# Altium PCB electronic_dc_load_v2.PcbDoc (part 2 of 4)
Units mm, origin at the board's own origin, x right, y up, seen from the top; angles counter-clockwise.
Board outline 170 x 170 mm, 4 copper layers (Top Layer, Int1(GND), Int2, Bottom Layer(PWR)), stack 1.607 mm thick; 177 components, 118 nets, 502 pads, 141 vias.
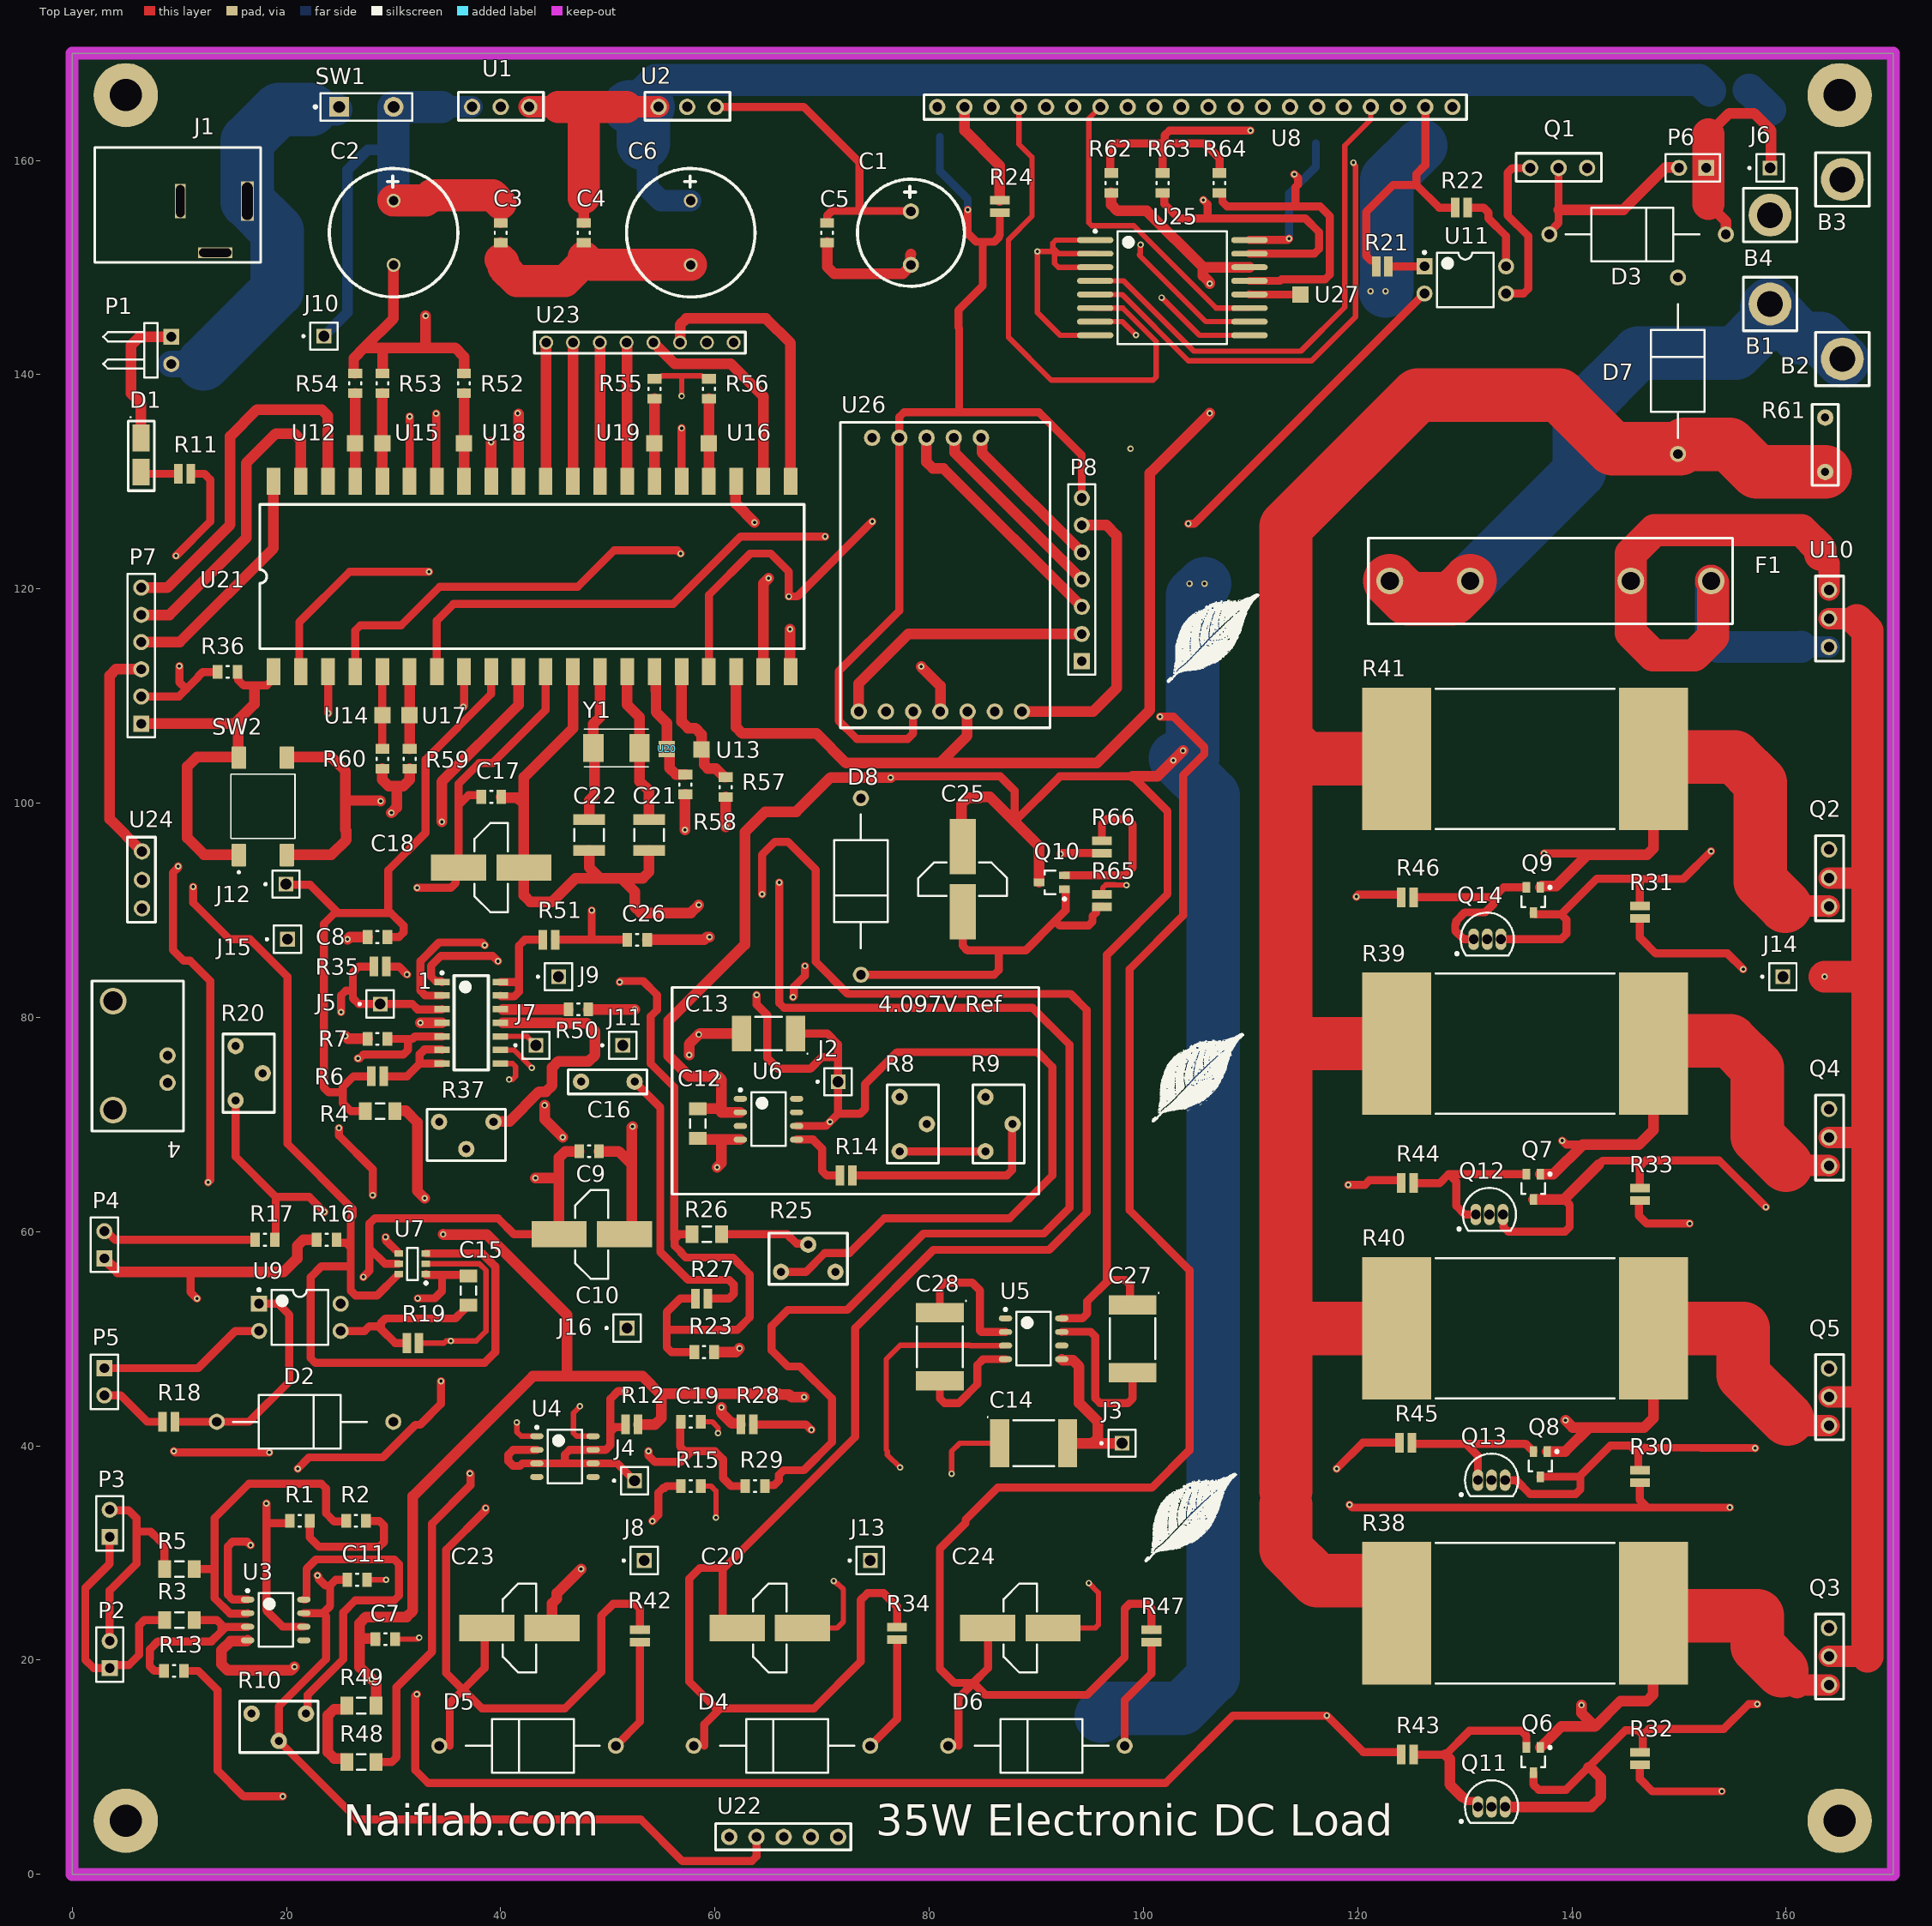
[diagram p0: Top Layer view]

## Part data (continued)
R1 R2 R13 R15 R36 R62 R63 R64: "RES SMD 10K OHM 1/4W 0604 WIDE", Case Code (Imperial)=0406, Case Code (Metric)=1016, Case/Package=Molded, Manufacturer=Vishay, Manufacturer Part Number=MCW0406MD1002BP100, Max Operating Temperature=155°C, Min Operating Temperature=-55°C, Power Rating=250mW, Resistor Type="Thin Film", Supplier Part Number 1=31W9016, Temperature Coefficient=25ppm/°C, Tolerance=0.1%, Voltage Rating=50V, Category="Chip SMD Resistors", ComponentLink1Description=http://www.farnell.com/datasheets/2046107.pdf?src-supplier=Farnell, ComponentLink1URL=http://www.farnell.com/datasheets/2046107.pdf?src-supplier=Farnell, ComponentLink2Description=http://www.mouser.com/ds/2/427/mcw406atpre-111221.pdf?src-supplier=Mouser, ComponentLink2URL=http://www.mouser.com/ds/2/427/mcw406atpre-111221.pdf?src-supplier=Mouser, ComponentLink3Description=http://components.arrow.com/part/dataview/53344020S9999208N6892?src-supplier=Arrow+Electronics, ComponentLink3URL=http://components.arrow.com/part/dataview/53344020S9999208N6892?src-supplier=Arrow+Electronics, ComponentLink4Description=http://www.farnell.com/datasheets/2046107.pdf?src-supplier=Element14, ComponentLink4URL=http://www.farnell.com/datasheets/2046107.pdf?src-supplier=Element14, ComponentLink5Description=http://www.vishay.com/docs/28847/mcw406atpre.pdf?src-supplier=Digi-Key, ComponentLink5URL=http://www.vishay.com/docs/28847/mcw406atpre.pdf?src-supplier=Digi-Key, ComponentLink6Description=http://www.vishay.com/docs/28847/mcw406atpre.pdf?src-supplier=Avnet, ComponentLink6URL=http://www.vishay.com/docs/28847/mcw406atpre.pdf?src-supplier=Avnet, Contact Plating=Tin, Depth=1.5mm, Height=0.3mm, Lead Free="Lead Free", Length=1.6mm, Military Standard=Not, Packaging="Tape and Reel", Pricing 1="1000=0.44000 (USD)", REACH SVHC=Unknown, Resistance=10kR, RoHS=Yes, Supplier 1=Newark, Voltage Rating (DC)=50V, Width=1mm
R3 R4 R5 R48 R49: "Res Thin Film 1206 1M Ohm 0.1% 0.25W(1/4W) ±25ppm/C Molded SMD Automotive Paper T/R", Case Code (Imperial)=1206, Case Code (Metric)=3216, Manufacturer="Vishay Dale", Manufacturer Part Number=TNPW12061M00BEEA, Max Operating Temperature=125°C, Max Power Dissipation=250mW, Min Operating Temperature=-55°C, Package Quantity=5000, Resistance=1MR, Resistance Tolerance=0.1%, Resistor Type="Thin Film", Supplier Part Number 1=TNP1.00MACCT-ND, Temperature Coefficient=25ppm/°C, Voltage Rating=200V, Case/Package=1206, Category="Chip SMD Resistors", ComponentLink1Description=https://datasheet.ciiva.com/2484/tnpw-e3-2484754.pdf?src-supplier=Digi-Key, ComponentLink1URL=https://datasheet.ciiva.com/2484/tnpw-e3-2484754.pdf?src-supplier=Digi-Key, ComponentLink2Description=https://datasheet.ciiva.com/2484/tnpw-e3-2484755.pdf?src-supplier=Digi-Key, ComponentLink2URL=https://datasheet.ciiva.com/2484/tnpw-e3-2484755.pdf?src-supplier=Digi-Key, ComponentLink3Description=https://datasheet.ciiva.com/2484/tnpw-e3-2484756.pdf?src-supplier=Digi-Key, ComponentLink3URL=https://datasheet.ciiva.com/2484/tnpw-e3-2484756.pdf?src-supplier=Digi-Key, ComponentLink4Description=https://datasheet.ciiva.com/22675/1599293-22675126.pdf?src-supplier=Element14, ComponentLink4URL=https://datasheet.ciiva.com/22675/1599293-22675126.pdf?src-supplier=Element14, ComponentLink5Description=https://datasheet.ciiva.com/16757/70201627-16757642.pdf?src-supplier=Allied+Electronics, ComponentLink5URL=https://datasheet.ciiva.com/16757/70201627-16757642.pdf?src-supplier=Allied+Electronics, ComponentLink6Description=https://datasheet.ciiva.com/46383/1599293-46383851.pdf?src-supplier=Element14, ComponentLink6URL=https://datasheet.ciiva.com/46383/1599293-46383851.pdf?src-supplier=Element14, Construction=Rectangular, Contact Plating=Tin, Depth=1.6mm, Features="Moisture Resistant,Automotive AEC-Q200,Anti-Sulfur", Height=0.55mm, Lead Free="Lead Free", Length=3.2mm, Military Standard=Not, Mount="Surface Mount", Number of Terminations=2, Packaging="Tape and Reel", Power Rating=250mW, Pricing 1="1=0.72000, 10=0.62700, 100=0.43700, 1000=0.25650, 2500=0.25270 (USD)", Radiation Hardening=No, REACH SVHC=Unknown, RoHS=Yes, RoHS Compliant=Yes, Series=TNPW, Size Code=1206, Stock 1=47810, Supplier 1=Digi-Key, Technology="THIN FILM", Termination=SMD/SMT, Tolerance=0.1%, Voltage Rating (DC)=200V, Width=1.6mm
R6 R18 R28 R51: "100Ω ±0.1%  0.25W"
R7 R16 R17 R23 R29 R50 R52 R53 R54 R55 R56 R57 R58 R59 R60: "RES SMD 10K OHM 0.1% 1/4W 0805", Case Code (Imperial)=0805, Case Code (Metric)=2012, Manufacturer=Panasonic, Manufacturer Part Number=ERJ-PB6B1002V, Max Operating Temperature=155°C, Max Power Dissipation=250mW, Min Operating Temperature=-55°C, Resistance=10kR, Resistor Type="Thick Film", Supplier Part Number 1=667-ERJ-PB6B1002V, Temperature Coefficient=50ppm/°C, Tolerance=0.1%, Case/Package=0805, Category="Chip SMD Resistors", ComponentLink1Description=https://industrial.panasonic.com/cdbs/www-data/pdf/RDM0000/DMM0000COL5.pdf?src-supplier=Digi-Key, ComponentLink1URL=https://industrial.panasonic.com/cdbs/www-data/pdf/RDM0000/DMM0000COL5.pdf?src-supplier=Digi-Key, ComponentLink2Description=https://industrial.panasonic.com/sa/system/files/data/download/catalog/id_fixed-resistors_e_2.pdf?src-supplier=Digi-Key, ComponentLink2URL=https://industrial.panasonic.com/sa/system/files/data/download/catalog/id_fixed-resistors_e_2.pdf?src-supplier=Digi-Key, Features="Automotive AEC-Q200", Height - Seated (Max)=0.028inch, Length=0.079inch, Number of Terminations=2, Packaging="Tape and Reel", Pricing 1="1=0.27000, 10=0.19900, 50=0.15600, 100=0.09100, 1000=0.04700, 10000=0.03500 (USD)", RoHS=Yes, Stock 1=10409, Supplier 1=Mouser, Width=0.049inch
R8 R9 R10 R25: "BOURNS         3296P-1-203LF            TRIMMER, 25 TURN 20K", Color=Blue, Manufacturer=Bourns, Manufacturer Part Number=3296P-1-203LF, Max Operating Temperature=125°C, Max Power Dissipation=500mW, Min Operating Temperature=-55°C, Package Quantity=50, Resistance=20kR, Resistance Tolerance=10%, Resistor Type=Cermet, Temperature Coefficient=100ppm/°C, Category="Variable Resistors and Potentiometers", ComponentLink1Description=https://datasheet.ciiva.com/1570/3296-1570384.pdf?src-supplier=Newark, ComponentLink1URL=https://datasheet.ciiva.com/1570/3296-1570384.pdf?src-supplier=Newark, ComponentLink2Description=https://datasheet.ciiva.com/11832/0900766b8069ccf4-11832206.pdf?src-supplier=RSComponents, ComponentLink2URL=https://datasheet.ciiva.com/11832/0900766b8069ccf4-11832206.pdf?src-supplier=RSComponents, ComponentLink3Description=https://datasheet.ciiva.com/29190/447270-da-01-en-trimmer-tht3296p-1-203lf-20-k-0-5w-29190277.pdf?src-supplier=Conrad, ComponentLink3URL=https://datasheet.ciiva.com/29190/447270-da-01-en-trimmer-tht3296p-1-203lf-20-k-0-5w-29190277.pdf?src-supplier=Conrad, ComponentLink4Description=https://datasheet.ciiva.com/2158/3296-2158304.pdf?src-supplier=Digi-Key, ComponentLink4URL=https://datasheet.ciiva.com/2158/3296-2158304.pdf?src-supplier=Digi-Key, ComponentLink5Description=https://datasheet.ciiva.com/8088/3296-8088855.pdf?src-supplier=Avnet, ComponentLink5URL=https://datasheet.ciiva.com/8088/3296-8088855.pdf?src-supplier=Avnet, ComponentLink6Description=https://datasheet.ciiva.com/14173/ew3296-dat-e-14173049.pdf?src-supplier=Distrelec, ComponentLink6URL=https://datasheet.ciiva.com/14173/ew3296-dat-e-14173049.pdf?src-supplier=Distrelec, ComponentLink7Description=https://datasheet.ciiva.com/16715/70153578-16715724.pdf?src-supplier=Allied+Electronics, ComponentLink7URL=https://datasheet.ciiva.com/16715/70153578-16715724.pdf?src-supplier=Allied+Electronics, ComponentLink8Description=https://datasheet.ciiva.com/1131/1815117-1131230.pdf?src-supplier=Element14, ComponentLink8URL=https://datasheet.ciiva.com/1131/1815117-1131230.pdf?src-supplier=Element14, Depth=11.55mm, Height=0.19inch, Lead Free="Lead Free", Length=9.53mm, Military Standard=Not, Mount="Through Hole,Panel,PCB", Number of Turns=25, Packaging=Rail/Tube, Power Rating=500mW, Pricing 1="100=1.67000, 500=1.31000 (USD)", Radiation Hardening=No, REACH SVHC="No SVHC", RoHS=Yes, RoHS Compliant=Yes, Series=3296, Stock 1=729, Supplier 1=Newark, Taper=Linear, Technology=CERMET, Termination=Pin, Tolerance=10%, Weight=0.03oz, Width=0.395inch
R11 R21 R24 R27 R34 R35 R42 R47: "Resistor;  Thin Film;  Res 1 Kilohms;  Pwr-Rtg 0.25 W;  Tol 0.1%;  SMT;  0805", Case Code (Imperial)=0805, Case Code (Metric)=2012, Manufacturer="TT IRC", Manufacturer Part Number=PFC-W0805LF-03-1001-B, Max Operating Temperature=150°C, Min Operating Temperature=-55°C, Package Quantity=1000, Power Rating=250mW, Resistance Tolerance=0.1%, Resistor Type="Thin Film", Supplier Part Number 1=66-PFC08LF1.0K-B, Temperature Coefficient=25ppm/°C, Voltage Rating=100V, Case/Package=0805, Category="Chip SMD Resistors", ComponentLink1Description=https://datasheet.ciiva.com/26849/getdatasheetpartid-728507-26849970.pdf?src-supplier=Verical, ComponentLink1URL=https://datasheet.ciiva.com/26849/getdatasheetpartid-728507-26849970.pdf?src-supplier=Verical, ComponentLink2Description=https://datasheet.ciiva.com/8036/126955-8036106.pdf?src-supplier=Element14, ComponentLink2URL=https://datasheet.ciiva.com/8036/126955-8036106.pdf?src-supplier=Element14, ComponentLink3Description=https://datasheet.ciiva.com/16756/70061376-16756399.pdf?src-supplier=Allied+Electronics, ComponentLink3URL=https://datasheet.ciiva.com/16756/70061376-16756399.pdf?src-supplier=Allied+Electronics, Construction=Rectangular, Depth=1.27mm, Height=0.5mm, Lead Free="Lead Free", Length=2.05mm, Military Standard=Not, Number of Pins=2, Packaging="Tape and Reel", Pricing 1="1=0.98000, 10=0.95500, 50=0.82700, 100=0.76400, 1000=0.50900, 10000=0.44600 (USD)", REACH SVHC="No SVHC", Resistance=1kR, RoHS=Yes, RoHS Compliant=Yes, Series=PFC, Size Code=0805, Stock 1=8948, Supplier 1=Mouser, Termination=SMD/SMT, Tolerance=0.1%, Voltage Rating (DC)=100V, Width=1.27mm
R12 R22 R30 R31 R32 R33: "2.2K ±0.1%  0.25W"
R14: "470K ohms ± 0.1% 0.25W"
R19: "47K ±0.1% 0.25W"
R20: "BOURNS         3296Y-1-504LF            TRIMMER, 25 TURN 500K", Color=Blue, Manufacturer=Bourns, Manufacturer Part Number=3296Y-1-504LF, Max Operating Temperature=125°C, Max Power Dissipation=500mW, Min Operating Temperature=-55°C, Package Quantity=50, Resistance=500kR, Resistance Tolerance=10%, Resistor Type=Cermet, Temperature Coefficient=100ppm/°C, Voltage Rating=300V, Category="Variable Resistors and Potentiometers", ComponentLink1Description=https://datasheet.ciiva.com/11832/0900766b8069ccf4-11832260.pdf?src-supplier=RSComponents, ComponentLink1URL=https://datasheet.ciiva.com/11832/0900766b8069ccf4-11832260.pdf?src-supplier=RSComponents, ComponentLink2Description=https://datasheet.ciiva.com/29122/447312-da-01-en-trimmer-tht-3296y-1-504lf-500k-0-5w-29122395.pdf?src-supplier=Conrad, ComponentLink2URL=https://datasheet.ciiva.com/29122/447312-da-01-en-trimmer-tht-3296y-1-504lf-500k-0-5w-29122395.pdf?src-supplier=Conrad, ComponentLink3Description=https://datasheet.ciiva.com/2156/3296-2156913.pdf?src-supplier=Digi-Key, ComponentLink3URL=https://datasheet.ciiva.com/2156/3296-2156913.pdf?src-supplier=Digi-Key, ComponentLink4Description=https://datasheet.ciiva.com/1131/1815117-1131508.pdf?src-supplier=Element14, ComponentLink4URL=https://datasheet.ciiva.com/1131/1815117-1131508.pdf?src-supplier=Element14, ComponentLink5Description=https://datasheet.ciiva.com/3266/3296-3266550.pdf?src-supplier=Avnet, ComponentLink5URL=https://datasheet.ciiva.com/3266/3296-3266550.pdf?src-supplier=Avnet, ComponentLink6Description=https://datasheet.ciiva.com/20164/68-0300e-20164135.pdf?src-supplier=Rapid+Electronics, ComponentLink6URL=https://datasheet.ciiva.com/20164/68-0300e-20164135.pdf?src-supplier=Rapid+Electronics, ComponentLink7Description=https://datasheet.ciiva.com/16716/70153578-16716249.pdf?src-supplier=Allied+Electronics, ComponentLink7URL=https://datasheet.ciiva.com/16716/70153578-16716249.pdf?src-supplier=Allied+Electronics, ComponentLink8Description=https://datasheet.ciiva.com/30113/3296-30113148.pdf?src-supplier=Onlinecomponents.com, ComponentLink8URL=https://datasheet.ciiva.com/30113/3296-30113148.pdf?src-supplier=Onlinecomponents.com, ComponentLink9Description=https://datasheet.ciiva.com/32423/dabourns3296-data-e-32423743.pdf?src-supplier=Distrelec, ComponentLink9URL=https://datasheet.ciiva.com/32423/dabourns3296-data-e-32423743.pdf?src-supplier=Distrelec, Depth=4.83mm, Height=0.395inch, Lead Diameter=0.5mm, Lead Free="Lead Free", Length=9.53mm, Military Standard=Not, Mount="Through Hole,Panel,PCB", Number of Turns=25, Packaging=Rail/Tube, Power Rating=500mW, Pricing 1="1=2.41000, 10=2.11700, 25=1.89800, 50=1.82500, 100=1.75200, 250=1.67900, 500=1.38700, 1000=1.31400, 5000=1.09500 (USD)", Radiation Hardening=No, REACH SVHC="No SVHC", RoHS=Yes, RoHS Compliant=Yes, Series=3296, Stock 1=290, Supplier 1=Digi-Key, Taper=Linear, Technology=CERMET, Termination=Pin, Tolerance=10%, Voltage Rating (DC)=300V, Weight=0.03oz, Width=0.19inch
R26: "Resistor SMD 4.7 MOhm  ±  1 % 1206, CRCW12064M70FKEA, Vishay", Case Code (Imperial)=1206, Case Code (Metric)=3216, Manufacturer=Vishay, Manufacturer Part Number=CRCW12064M70FKEA, Max Operating Temperature=155°C, Max Power Dissipation=250mW, Min Operating Temperature=-55°C, Package Quantity=10, Resistance=4.7MR, Resistance Tolerance=1%, Resistor Type="Thick Film", Supplier Part Number 1=541-4.70MFCT-ND, Temperature Coefficient=100ppm/°C, Voltage Rating=200V, Case/Package=1206, Category="Chip SMD Resistors", ComponentLink1Description=https://datasheet.ciiva.com/11811/0900766b80d98b5e-11811376.pdf?src-supplier=RSComponents, ComponentLink1URL=https://datasheet.ciiva.com/11811/0900766b80d98b5e-11811376.pdf?src-supplier=RSComponents, ComponentLink2Description=https://datasheet.ciiva.com/2497/dcrcwe3-2497009.pdf?src-supplier=Digi-Key, ComponentLink2URL=https://datasheet.ciiva.com/2497/dcrcwe3-2497009.pdf?src-supplier=Digi-Key, ComponentLink3Description=https://datasheet.ciiva.com/2497/dcrcwe3-2497010.pdf?src-supplier=Digi-Key, ComponentLink3URL=https://datasheet.ciiva.com/2497/dcrcwe3-2497010.pdf?src-supplier=Digi-Key, ComponentLink4Description=https://datasheet.ciiva.com/2497/dcrcwe3-2497011.pdf?src-supplier=Digi-Key, ComponentLink4URL=https://datasheet.ciiva.com/2497/dcrcwe3-2497011.pdf?src-supplier=Digi-Key, ComponentLink5Description=https://datasheet.ciiva.com/6074/1697337-6074135.pdf?src-supplier=Farnell, ComponentLink5URL=https://datasheet.ciiva.com/6074/1697337-6074135.pdf?src-supplier=Farnell, ComponentLink6Description=https://datasheet.ciiva.com/7843/1697337-7843431.pdf?src-supplier=Element14, ComponentLink6URL=https://datasheet.ciiva.com/7843/1697337-7843431.pdf?src-supplier=Element14, ComponentLink7Description=https://datasheet.ciiva.com/7843/1697337-7843432.pdf?src-supplier=Element14, ComponentLink7URL=https://datasheet.ciiva.com/7843/1697337-7843432.pdf?src-supplier=Element14, ComponentLink8Description=https://datasheet.ciiva.com/8896/dcrcwe3-8896296.pdf?src-supplier=Avnet, ComponentLink8URL=https://datasheet.ciiva.com/8896/dcrcwe3-8896296.pdf?src-supplier=Avnet, ComponentLink9Description=https://datasheet.ciiva.com/16894/dcrcwe3-16894747.pdf?src-supplier=Avnet+Europe, ComponentLink9URL=https://datasheet.ciiva.com/16894/dcrcwe3-16894747.pdf?src-supplier=Avnet+Europe, ComponentLink10Description=https://datasheet.ciiva.com/22706/1697337-22706301.pdf?src-supplier=Element14, ComponentLink10URL=https://datasheet.ciiva.com/22706/1697337-22706301.pdf?src-supplier=Element14, ComponentLink11Description=https://datasheet.ciiva.com/26316/fld-crcw-e3-data-en-26316494.pdf?src-supplier=Distrelec, ComponentLink11URL=https://datasheet.ciiva.com/26316/fld-crcw-e3-data-en-26316494.pdf?src-supplier=Distrelec, Construction=Rectangular, Contact Plating=Tin, Depth=1.6mm, Features="Automotive AEC-Q200", Height=0.55mm, Lead Free="Lead Free", Length=3.2mm, Military Standard=Not, Number of Pins=2, Number of Terminations=2, Packaging="Tape and Reel", Power Rating=250mW, Pricing 1="1=0.10000, 10=0.08000, 100=0.03060, 1000=0.01346, 2500=0.01162 (USD)", Radiation Hardening=No, REACH SVHC=Unknown, RoHS=Yes, RoHS Compliant=Yes, Series=CRCW, Stock 1=13706, Supplier 1=Digi-Key, Technology="THICK FILM", Termination=SMD/SMT, Tolerance=1%, Voltage Rating (DC)=200V, Weight=0.000353oz, Width=0.063inch
R37: "GLOVE, POLYAMIDE, L/FREE, PU, SIZE 6 - More Details", Color=Blue, Manufacturer=Bourns, Manufacturer Part Number=3296Y-1-201LF, Max Operating Temperature=125°C, Max Power Dissipation=500mW, Min Operating Temperature=-55°C, Package Quantity=50, Resistance Tolerance=10%, Resistor Type=Cermet, Supplier Part Number 1=3296Y-201LF-ND, Temperature Coefficient=100ppm/°C, Voltage Rating=300V, Category="Variable Resistors and Potentiometers", ComponentLink1Description=https://datasheet.ciiva.com/11831/0900766b8069ccf4-11831017.pdf?src-supplier=RSComponents, ComponentLink1URL=https://datasheet.ciiva.com/11831/0900766b8069ccf4-11831017.pdf?src-supplier=RSComponents, ComponentLink2Description=https://datasheet.ciiva.com/29122/447304-da-01-en-trimmer-tht3296y-1-201lf-200r-0-5w-29122391.pdf?src-supplier=Conrad, ComponentLink2URL=https://datasheet.ciiva.com/29122/447304-da-01-en-trimmer-tht3296y-1-201lf-200r-0-5w-29122391.pdf?src-supplier=Conrad, ComponentLink3Description=https://datasheet.ciiva.com/16716/70153578-16716822.pdf?src-supplier=Allied+Electronics, ComponentLink3URL=https://datasheet.ciiva.com/16716/70153578-16716822.pdf?src-supplier=Allied+Electronics, ComponentLink4Description=https://datasheet.ciiva.com/30066/3296-30066951.pdf?src-supplier=Onlinecomponents.com, ComponentLink4URL=https://datasheet.ciiva.com/30066/3296-30066951.pdf?src-supplier=Onlinecomponents.com, ComponentLink5Description=https://datasheet.ciiva.com/2158/3296-2158313.pdf?src-supplier=Digi-Key, ComponentLink5URL=https://datasheet.ciiva.com/2158/3296-2158313.pdf?src-supplier=Digi-Key, ComponentLink6Description=https://datasheet.ciiva.com/1131/1815117-1131451.pdf?src-supplier=Element14, ComponentLink6URL=https://datasheet.ciiva.com/1131/1815117-1131451.pdf?src-supplier=Element14, ComponentLink7Description=https://datasheet.ciiva.com/14173/dabourns3296-data-e-14173005.pdf?src-supplier=Distrelec, ComponentLink7URL=https://datasheet.ciiva.com/14173/dabourns3296-data-e-14173005.pdf?src-supplier=Distrelec, Depth=4.83mm, Height=0.395inch, Lead Diameter=0.5mm, Lead Free="Lead Free", Length=9.53mm, Military Standard=Not, Mount="Through Hole,Panel,PCB", Number of Turns=25, Packaging=Rail/Tube, Power Rating=500mW, Pricing 1="1=2.41000, 10=2.11700, 25=1.89800, 50=1.82500, 100=1.75200, 250=1.67900, 500=1.38700, 1000=1.31400, 5000=1.09500 (USD)", Radiation Hardening=No, REACH SVHC="No SVHC", Resistance=200R, RoHS=Yes, RoHS Compliant=Yes, Series=3296, Stock 1=3, Supplier 1=Digi-Key, Taper=Linear, Technology=CERMET, Termination=Pin, Tolerance=10%, Voltage Rating (DC)=300V, Weight=0.03oz, Width=9.53mm
R38 R39 R40 R41: "RES 1 OHM 5W 1% AXIAL", Case/Package=Conformal, Manufacturer="Vishay BCcomponents", Manufacturer Part Number=PAC500001008FAC000, Max Operating Temperature=275°C, Max Power Dissipation=5W, Min Operating Temperature=-55°C, Package Quantity=1, Resistor Type=Wirewound, Supplier Part Number 1=71-PAC500001008FAC00, Temperature Coefficient=100ppm/°C, Tolerance=1%, Category="Through-Hole Resistors", ComponentLink1Description=https://datasheet.ciiva.com/2720/pacserie-2720053.pdf?src-supplier=Digi-Key, ComponentLink1URL=https://datasheet.ciiva.com/2720/pacserie-2720053.pdf?src-supplier=Digi-Key, ComponentLink2Description=https://datasheet.ciiva.com/2720/pacserie-2720054.pdf?src-supplier=Digi-Key, ComponentLink2URL=https://datasheet.ciiva.com/2720/pacserie-2720054.pdf?src-supplier=Digi-Key, ComponentLink3Description=https://datasheet.ciiva.com/8401/pacserie-8401197.pdf?src-supplier=Avnet, ComponentLink3URL=https://datasheet.ciiva.com/8401/pacserie-8401197.pdf?src-supplier=Avnet, Construction=Cylindrical, Contact Plating=Tin, Diameter=7.5mm, Features="Flame Retardant Coating", Length=26mm, Military Standard=Not, Mount="Through Hole", Number of Terminations=2, Packaging="Tape and Reel", Power Rating=5W, Pricing 1="1=1.28000, 10=0.95500, 50=0.95500, 100=0.69800, 1000=0.48800, 10000=0.45600 (USD)", Radiation Hardening=No, Resistance=1R, RoHS=Yes, RoHS Compliant=Yes, Series=PAC, Stock 1=101, Supplier 1=Mouser, Termination=Axial
R43 R44 R45 R46: "270KR ±0.1%  0.25W"
R61: "BOURNS - PWR220T-35-R100F - RESISTOR, POWER, 0.1R, 0.01, 35W", Case/Package=TO-220, Manufacturer=Bourns, Manufacturer Part Number=PWR220T-35-R100F, Max Operating Temperature=155°C, Max Power Dissipation=35W, Min Operating Temperature=-55°C, Package Quantity=50, Resistance=100mR, Resistance Tolerance=1%, Resistor Type="Thick Film", Supplier Part Number 1=PWR220T-35-R100F-ND, Temperature Coefficient=100ppm/°C, Threshold Voltage=1.4V, Voltage Rating=2kV, Voltage Rating (DC)=250V, Category="Through-Hole Resistors", ComponentLink1Description=https://datasheet.ciiva.com/7986/1869472-7986042.pdf?src-supplier=Element14, ComponentLink1URL=https://datasheet.ciiva.com/7986/1869472-7986042.pdf?src-supplier=Element14, Construction=Rectangular, Depth=4mm, Features="Automotive AEC-Q200", Height=14.6mm, Lead Diameter=0.72mm, Lead Pitch=5.08mm, Length=10.1mm, Military Standard=Not, Number of Terminations=2, Packaging=Rail/Tube, Power Rating=35W, Pricing 1="1=4.48000, 10=4.05400, 100=3.01880, 1000=2.17350, 2500=2.13900 (USD)", REACH SVHC="No SVHC", RoHS=Yes, RoHS Compliant=Yes, Series=PWR220T-35, Stock 1=660, Supplier 1=Digi-Key, Technology="THICK FILM", Termination=Radial, Tolerance=1%, Width=0.157inch
R65: "330K ohms ±0.1%  0.25W"
R66: "100K ±0.1%  0.25W"
SW1: "Single-Pole, Single-Throw Switch", LatestRevisionDate=17-Jul-2002, LatestRevisionNote="Re-released for DXP Platform.", PackageDescription="Switch; 2 Leads", PackageReference=SPST-2, Published=24-Mar-1999, Publisher="Altium Limited"
SW2: "Switch Tactile OFF (ON) SPST Round Button Gull Wing 0.05A 24VDC 2.6N SMD T/R", Package=None, Availability=Unavailable, MF="{'manufacturer': u'TE Connectivity'}", MP=FSM4JSMA, Price=None
U1: "Fairchild Semiconductor", Case/Package=TO-220-3, Dropout Voltage=2V, Manufacturer="ON Semiconductor / Fairchild", Max Input Voltage=35V, Max Operating Temperature=125°C, Max Output Current=1A, Min Input Voltage=14.5V, Min Operating Temperature=-40°C, Min Output Voltage=12V, Output Voltage Accuracy=4%, Package Quantity=50, Power Supply Rejection Ratio (PSRR)=71dB, Quiescent Current=8mA, Accuracy=4%, Category="Voltage Regulators - Linear", ComponentLink1Description=https://datasheet.ciiva.com/26908/lm7812ct-26908840.pdf?src-supplier=IIIC, ComponentLink1URL=https://datasheet.ciiva.com/26908/lm7812ct-26908840.pdf?src-supplier=IIIC, ComponentLink2Description=https://datasheet.ciiva.com/2039/lm7805-2039371.pdf?src-supplier=Digi-Key, ComponentLink2URL=https://datasheet.ciiva.com/2039/lm7805-2039371.pdf?src-supplier=Digi-Key, ComponentLink3Description=https://datasheet.ciiva.com/25974/lm7812-25974492.pdf?src-supplier=Avnet+Europe, ComponentLink3URL=https://datasheet.ciiva.com/25974/lm7812-25974492.pdf?src-supplier=Avnet+Europe, Contact Plating=Tin,Matte, Height=8.89mm, Lead Free="Lead Free", Length=10.16mm, Manufacturer Part Number=LM7812CT, Mount="Through Hole", Nominal Output Voltage=12V, Number of Outputs=1, Number of Pins=3, Number of Regulators=1, Output Current=1A, Output Type=Fixed, Output Voltage=12V, Packaging=Rail/Tube, Polarity=Positive, Radiation Hardening=No, REACH SVHC="No SVHC", RoHS=Yes, RoHS Compliant=Yes, Stock 1=6000, Supplier 1=Avnet, Supplier Part Number 1=LM7812CT, Weight=1.214g, Width=4.7mm
U2: "Standard Regulator Pos 5V 2.2A 3-Pin(3+Tab) TO-220AB Rail", Case/Package=TO-220-3, Current Rating=1A, Dropout Voltage=2V, Manufacturer="ON Semiconductor / Fairchild", Max Input Voltage=35V, Max Operating Temperature=125°C, Max Output Voltage=5.2V, Min Input Voltage=7V, Min Operating Temperature=-40°C, Min Output Voltage=5V, Output Voltage Accuracy=4%, Package Quantity=50, Power Supply Rejection Ratio (PSRR)=73dB, Quiescent Current=8mA, Accuracy=4%, Category="Voltage Regulators - Linear", ComponentLink1Description=https://datasheet.ciiva.com/19456/786138-19456361.pdf?src-supplier=Jameco, ComponentLink1URL=https://datasheet.ciiva.com/19456/786138-19456361.pdf?src-supplier=Jameco, ComponentLink2Description=https://datasheet.ciiva.com/26904/lm7805ct-26904988.pdf?src-supplier=IIIC, ComponentLink2URL=https://datasheet.ciiva.com/26904/lm7805ct-26904988.pdf?src-supplier=IIIC, ComponentLink3Description=https://datasheet.ciiva.com/2039/lm7805-2039365.pdf?src-supplier=Digi-Key, ComponentLink3URL=https://datasheet.ciiva.com/2039/lm7805-2039365.pdf?src-supplier=Digi-Key, ComponentLink4Description=https://datasheet.ciiva.com/8239/lm7812-8239478.pdf?src-supplier=Avnet, ComponentLink4URL=https://datasheet.ciiva.com/8239/lm7812-8239478.pdf?src-supplier=Avnet, ComponentLink5Description=https://datasheet.ciiva.com/1512/1855686-1512106.pdf?src-supplier=Element14, ComponentLink5URL=https://datasheet.ciiva.com/1512/1855686-1512106.pdf?src-supplier=Element14, ComponentLink6Description=https://datasheet.ciiva.com/17332/lm7805-17332792.pdf?src-supplier=Future+Electronics, ComponentLink6URL=https://datasheet.ciiva.com/17332/lm7805-17332792.pdf?src-supplier=Future+Electronics, ComponentLink7Description=https://datasheet.ciiva.com/1512/1855686-1512105.pdf?src-supplier=Element14, ComponentLink7URL=https://datasheet.ciiva.com/1512/1855686-1512105.pdf?src-supplier=Element14, ComponentLink8Description=https://datasheet.ciiva.com/1511/1855686-1511835.pdf?src-supplier=Element14, ComponentLink8URL=https://datasheet.ciiva.com/1511/1855686-1511835.pdf?src-supplier=Element14, ComponentLink9Description=https://datasheet.ciiva.com/48694/001253095-da-01-en-ic-reg-ldo-5v-1a-lm7805ct-to-220-3-fsc-48694790.pdf?src-supplier=Conrad, ComponentLink9URL=https://datasheet.ciiva.com/48694/001253095-da-01-en-ic-reg-ldo-5v-1a-lm7805ct-to-220-3-fsc-48694790.pdf?src-supplier=Conrad, Height=16.3mm, Lead Free="Lead Free", Length=10.67mm, Manufacturer Part Number=LM7805CT, Max Output Current=1A, Mount="Through Hole", Nominal Output Voltage=5V, Number of Outputs=1, Number of Pins=3, Number of Regulators=1, Output Current=1A, Output Type=Fixed, Output Voltage=5V, Packaging=Rail/Tube, Polarity=Positive, Pricing 1="331=1.02898, 340=1.02141, 670=1.01384, 1700=1.00628, 3400=0.99871, 17000=0.99115, 34000=0.98358 (USD)", Radiation Hardening=No, REACH SVHC="No SVHC", RoHS=Yes, RoHS Compliant=Yes, Stock 1=9559, Supplier 1=Avnet, Supplier Part Number 1=LM7805CT, Weight=1.214g, Width=4.7mm
U3: "Operational Amplifier Single 1 MHz SO-8, OPA277UA, Texas Instruments", Case/Package=D, Dual Supply Voltage=9V, Input Bias Current=2.8nA, Input Offset Voltage (Vos)=20uV, Manufacturer="Texas Instruments", Manufacturer Part Number=OPA277UA, Max Dual Supply Voltage=18V, Max I/O Voltage=50uV, Max Operating Temperature=85°C, Min Dual Supply Voltage=2V, Min Operating Temperature=-40°C, Nominal Supply Current=825uA, Operating Supply Current=790uA, Output Current per Channel=35mA, Package Quantity=75, Supplier Part Number 1=OPA277UA-ND, Voltage Gain=140dB, Bandwidth=1MHz, Category="Amplifiers - Op Amps, Buffer, Instrumentation", Common Mode Rejection Ratio=115dB, ComponentLink1Description=https://datasheet.ciiva.com/2973/opa4277-2973984.pdf?src-supplier=Avnet, ComponentLink1URL=https://datasheet.ciiva.com/2973/opa4277-2973984.pdf?src-supplier=Avnet, ComponentLink2Description=https://datasheet.ciiva.com/1799/opa277-1799267.pdf?src-supplier=Digi-Key, ComponentLink2URL=https://datasheet.ciiva.com/1799/opa277-1799267.pdf?src-supplier=Digi-Key, ComponentLink3Description=https://datasheet.ciiva.com/7738/1830880-7738390.pdf?src-supplier=Element14, ComponentLink3URL=https://datasheet.ciiva.com/7738/1830880-7738390.pdf?src-supplier=Element14, ComponentLink4Description=https://datasheet.ciiva.com/26243/opa4277-26243593.pdf?src-supplier=Avnet+Europe, ComponentLink4URL=https://datasheet.ciiva.com/26243/opa4277-26243593.pdf?src-supplier=Avnet+Europe, Contact Plating=Gold, Gain Bandwidth Product=1MHz, Height=1.58mm, Lead Free="Lead Free", Length=4.9mm, Max Supply Voltage=18V, Nominal Gain Bandwidth Product=1MHz, Number of Amplifiers=1, Number of Channels=1, Number of Circuits=1, Number of Elements=1, Number of Pins=8, Packaging=Rail/Tube, Pricing 1="1=3.72000, 10=3.34300, 25=3.16000, 100=2.73880, 250=2.59832, 500=2.33148, 1000=2.21275 (USD)", Radiation Hardening=No, REACH SVHC="No SVHC", RoHS=Yes, RoHS Compliant=Yes, Slew Rate=0.8V/µs, Stock 1=3292, Supplier 1=Digi-Key, Unity Gain Bandwidth Product=1MHz, Width=3.91mm
U4: "V-Ref Adjustable 2.5V to 36V 100mA 8-Pin SOP T/R", Case/Package=SOP, Cathode Current=1mA, Current Rating=100mA, Manufacturer="ON Semiconductor / Fairchild", Max Input Voltage=36V, Max Operating Temperature=85°C, Min Operating Temperature=-25°C, Min Output Voltage=2.5V, Package Quantity=3000, Temperature Coefficient=50ppm/°C, Tolerance=2%, Category="Voltage References", ComponentLink1Description=https://datasheet.ciiva.com/4908/lm431a-189989-4908452.pdf?src-supplier=Mouser, ComponentLink1URL=https://datasheet.ciiva.com/4908/lm431a-189989-4908452.pdf?src-supplier=Mouser, ComponentLink2Description=https://datasheet.ciiva.com/29571/lm431a-29571926.pdf?src-supplier=Digi-Key, ComponentLink2URL=https://datasheet.ciiva.com/29571/lm431a-29571926.pdf?src-supplier=Digi-Key, ComponentLink3Description=https://datasheet.ciiva.com/29571/lm431a-29571925.pdf?src-supplier=Digi-Key, ComponentLink3URL=https://datasheet.ciiva.com/29571/lm431a-29571925.pdf?src-supplier=Digi-Key, ComponentLink4Description=https://datasheet.ciiva.com/9215/lm431c-9215048.pdf?src-supplier=Avnet, ComponentLink4URL=https://datasheet.ciiva.com/9215/lm431c-9215048.pdf?src-supplier=Avnet, Lead Free="Lead Free", Manufacturer Part Number=LM431ACMX, Max Output Current=100mA, Max Output Voltage=36V, Mount="Surface Mount", Number of Channels=1, Number of Pins=8, Output Current=100mA, Output Type=Adjustable, Output Voltage=36V, Packaging="Tape and Reel", Reference Type=Shunt,Adjustable, RoHS=Yes, RoHS Compliant=Yes, Series=-, Stock 1=40099, Supplier 1=Avnet, Supplier Part Number 1=LM431ACMX, Weight=0.2304g
U5: "LINEAR TECHNOLOGY - LTC1046CS8#PBF - VOLT CONVERTER, SMD, SOIC8, 1046", Case/Package=SOIC, Manufacturer="Analog Devices / Linear Technology", Manufacturer Part Number=LTC1046CS8#PBF, Max Input Voltage=6V, Max Operating Temperature=70°C, Max Output Current=50mA, Max Output Voltage=-1.5V, Min Input Voltage=1.5V, Min Operating Temperature=0°C, Min Output Voltage=-6V, Operating Supply Current=165uA, Output Voltage=3V, Package Quantity=100, Supplier Part Number 1=LTC1046CS8#PBF-ND, Switching Frequency=30kHz, Category="Voltage Regulators - Switching", ComponentLink1Description=https://datasheet.ciiva.com/2024/2898-2024864.pdf?src-supplier=Digi-Key, ComponentLink1URL=https://datasheet.ciiva.com/2024/2898-2024864.pdf?src-supplier=Digi-Key, ComponentLink2Description=https://datasheet.ciiva.com/30477/0900766b8125257c-30477616.pdf?src-supplier=RSComponents, ComponentLink2URL=https://datasheet.ciiva.com/30477/0900766b8125257c-30477616.pdf?src-supplier=RSComponents, ComponentLink3Description=https://datasheet.ciiva.com/15114/getdatasheetpartid-135603-15114038.pdf?src-supplier=Verical, ComponentLink3URL=https://datasheet.ciiva.com/15114/getdatasheetpartid-135603-15114038.pdf?src-supplier=Verical, ComponentLink4Description=https://datasheet.ciiva.com/19474/1745629-19474318.pdf?src-supplier=Jameco, ComponentLink4URL=https://datasheet.ciiva.com/19474/1745629-19474318.pdf?src-supplier=Jameco, ComponentLink5Description=https://datasheet.ciiva.com/26898/ltc1046cs8-pbf-26898654.pdf?src-supplier=IIIC, ComponentLink5URL=https://datasheet.ciiva.com/26898/ltc1046cs8-pbf-26898654.pdf?src-supplier=IIIC, ComponentLink6Description=https://datasheet.ciiva.com/6185/1573420-6185372.pdf?src-supplier=Farnell, ComponentLink6URL=https://datasheet.ciiva.com/6185/1573420-6185372.pdf?src-supplier=Farnell, Height=1.498mm, Lead Free="Lead Free", Length=5mm, Max Supply Voltage=6V, Min Supply Voltage=1.5V, Number of Outputs=1, Number of Pins=8, Output Current=50mA, Output Type=Adjustable, Packaging="Cut Tape", Pricing 1="1=6.96000, 10=6.29000, 25=5.99760, 100=5.20760, 250=4.97352, 500=4.53468, 1000=4.14000 (USD)", Radiation Hardening=No, REACH SVHC="No SVHC", RoHS=Yes, RoHS Compliant=Yes, Series=-, Stock 1=46, Supplier 1=Digi-Key, Synchronous Rectifier=No, Width=3.988mm
U6: "IC VREF SERIES 4.096V 8SOIC", Case/Package=D, Manufacturer="Texas Instruments", Max Input Voltage=18V, Max Operating Temperature=125°C, Max Output Current=10mA, Max Output Voltage=4.096V, Min Input Voltage=4.296V, Min Operating Temperature=-40°C, Operating Supply Current=800uA, Operating Supply Voltage=24V, Package Quantity=75, Quiescent Current=1mA, Supplier Part Number 1=595-REF5040AID, Temperature Coefficient=3ppm/°C, Tolerance=0.1%, Category="Voltage References", ComponentLink1Description=https://datasheet.ciiva.com/2007/ref5020-2007515.pdf?src-supplier=Digi-Key, ComponentLink1URL=https://datasheet.ciiva.com/2007/ref5020-2007515.pdf?src-supplier=Digi-Key, ComponentLink2Description=https://datasheet.ciiva.com/3235/ref5050-3235581.pdf?src-supplier=Avnet, ComponentLink2URL=https://datasheet.ciiva.com/3235/ref5050-3235581.pdf?src-supplier=Avnet, Height=1.5mm, Lead Free="Lead Free", Length=5mm, Manufacturer Part Number=REF5040AID, Number of Channels=1, Number of Pins=8, Output Current=10mA, Output Voltage=4.096V, Packaging=Rail/Tube, Pricing 1="1=4.08000, 10=3.67000, 50=3.47000, 100=3.47000, 1000=3.47000, 10000=3.47000 (USD)", Radiation Hardening=No, REACH SVHC="No SVHC", Reference Type=Series,Fixed, Reference Voltage=4.096V, RoHS=Yes, RoHS Compliant=Yes, Stock 1=277, Supplier 1=Mouser, Weight=0.002677oz, Width=4mm
U7: "INVERTER SCHMITT TRIGGER, SOT-23-6, FULL REEL; Logic Type:Inverter Schmitt Trigger; Output Current:32mA; No. of Inputs:1; Supply Voltage Min:1.65V; Supply Voltage Max:5.5V; Logic Case Style:SOT-23; No. of Pins:6; Family Type:LVC ;RoHS Compliant: Yes", Case/Package=SOT-23, High Level Output Current=-32mA, Low Level Output Current=32mA, Manufacturer="Texas Instruments", Max Operating Temperature=125°C, Max Supply Voltage=5.5V, Min Operating Temperature=-40°C, Min Supply Voltage=1.65V, Package Quantity=3000, Quiescent Current=10uA, Supplier Part Number 1=296-13010-1-ND, Category="Logic Gates", ComponentLink1Description=https://datasheet.ciiva.com/4827/sn74lvc2g14-50958-4827361.pdf?src-supplier=Mouser, ComponentLink1URL=https://datasheet.ciiva.com/4827/sn74lvc2g14-50958-4827361.pdf?src-supplier=Mouser, ComponentLink2Description=https://datasheet.ciiva.com/28540/1772571-28540805.pdf?src-supplier=Element14, ComponentLink2URL=https://datasheet.ciiva.com/28540/1772571-28540805.pdf?src-supplier=Element14, ComponentLink3Description=https://datasheet.ciiva.com/15089/getdatasheetpartid-44147-15089068.pdf?src-supplier=Verical, ComponentLink3URL=https://datasheet.ciiva.com/15089/getdatasheetpartid-44147-15089068.pdf?src-supplier=Verical, ComponentLink4Description=https://datasheet.ciiva.com/34301/1046238-34301917.pdf?src-supplier=Jameco, ComponentLink4URL=https://datasheet.ciiva.com/34301/1046238-34301917.pdf?src-supplier=Jameco, ComponentLink5Description=https://datasheet.ciiva.com/1864/sn74lvc2g14-1864305.pdf?src-supplier=Digi-Key, ComponentLink5URL=https://datasheet.ciiva.com/1864/sn74lvc2g14-1864305.pdf?src-supplier=Digi-Key, ComponentLink6Description=https://datasheet.ciiva.com/1864/sn74lvc2g14-1864306.pdf?src-supplier=Digi-Key, ComponentLink6URL=https://datasheet.ciiva.com/1864/sn74lvc2g14-1864306.pdf?src-supplier=Digi-Key, ComponentLink7Description=https://datasheet.ciiva.com/1864/sn74lvc2g14-1864307.pdf?src-supplier=Digi-Key, ComponentLink7URL=https://datasheet.ciiva.com/1864/sn74lvc2g14-1864307.pdf?src-supplier=Digi-Key, ComponentLink8Description=https://datasheet.ciiva.com/14288/sn74lvc2g14-14288309.pdf?src-supplier=Avnet, ComponentLink8URL=https://datasheet.ciiva.com/14288/sn74lvc2g14-14288309.pdf?src-supplier=Avnet, ComponentLink9Description=https://datasheet.ciiva.com/26042/sn74lvc2g14-26042406.pdf?src-supplier=Avnet+Europe, ComponentLink9URL=https://datasheet.ciiva.com/26042/sn74lvc2g14-26042406.pdf?src-supplier=Avnet+Europe, ComponentLink10Description=https://datasheet.ciiva.com/7783/1768119-7783611.pdf?src-supplier=Element14, ComponentLink10URL=https://datasheet.ciiva.com/7783/1768119-7783611.pdf?src-supplier=Element14, ComponentLink11Description=https://datasheet.ciiva.com/7783/1768119-7783612.pdf?src-supplier=Element14, ComponentLink11URL=https://datasheet.ciiva.com/7783/1768119-7783612.pdf?src-supplier=Element14, Contact Plating=Tin,Matte, Height=1.15mm, Lead Free="Lead Free", Length=2.9mm, Logic Function="Buffer,Inverter,Inverting,Schmitt Trigger", Manufacturer Part Number=SN74LVC2G14DBVR, Max Output Current=32mA, Mount="Surface Mount", Number of Bits=2, Number of Circuits=2, Number of Elements=2, Number of Gates=2, Number of Inputs=1, Number of Pins=6, Output Current=32mA, Packaging="Tape and Reel", Pricing 1="1=0.43000, 10=0.32300, 25=0.29160, 100=0.20140, 250=0.16960, 500=0.13780, 1000=0.10600 (USD)", Propagation Delay=9.5ns, Radiation Hardening=No, REACH SVHC="No SVHC", RoHS=Yes, RoHS Compliant=Yes, Schmitt Trigger Input=Yes, Stock 1=686, Supplier 1=Digi-Key, Termination=SMD/SMT, Turn-On Delay Time=4.3ns, Weight=0.000557oz, Width=1.6mm
U8: "Grapghic LCD based  on st7920  controller  128x64"
U9 U11: "4-Pin Phototransistor Optocoupler", DatasheetVersion=Nov-2003, LatestRevisionDate=04-Mar-2005, LatestRevisionNote="Sch pins 3 & 4 Swapped.", PackageReference=DIP-4, Published=24-Mar-1999, Publisher="Altium Limited"
U10: "DIODE ARRAY SCHOTTKY 100V TO220", Average Rectified Current=20A, Case/Package=TO-220-3, Forward Voltage=900mV, Manufacturer="ON Semiconductor", Max Forward Surge Current (Ifsm)=350A, Max Operating Temperature=175°C, Max Repetitive Reverse Voltage (Vrrm)=100V, Max Reverse Current=10uA, Min Operating Temperature=-65°C, Package Quantity=50, Supplier Part Number 1=MBR41H100CTGOS-ND, Category="Schottky Diodes", ComponentLink1Description=https://datasheet.ciiva.com/908/mbr41h100ct-d-908465.pdf?src-supplier=Avnet, ComponentLink1URL=https://datasheet.ciiva.com/908/mbr41h100ct-d-908465.pdf?src-supplier=Avnet, ComponentLink2Description=https://datasheet.ciiva.com/30479/0900766b812212ba-30479299.pdf?src-supplier=RSComponents, ComponentLink2URL=https://datasheet.ciiva.com/30479/0900766b812212ba-30479299.pdf?src-supplier=RSComponents, ComponentLink3Description=https://datasheet.ciiva.com/7962/mbr41h100ct-d-7962757.pdf?src-supplier=Element14, ComponentLink3URL=https://datasheet.ciiva.com/7962/mbr41h100ct-d-7962757.pdf?src-supplier=Element14, ComponentLink4Description=https://datasheet.ciiva.com/16362/mbr41h100ct-d-16362069.pdf?src-supplier=Future+Electronics, ComponentLink4URL=https://datasheet.ciiva.com/16362/mbr41h100ct-d-16362069.pdf?src-supplier=Future+Electronics, ComponentLink5Description=https://datasheet.ciiva.com/908/mbr41h100ct-d-908438.pdf?src-supplier=Digi-Key, ComponentLink5URL=https://datasheet.ciiva.com/908/mbr41h100ct-d-908438.pdf?src-supplier=Digi-Key, Current Rating=20A, Element Configuration="Common Cathode", Forward Current=20A, Height=15.75mm, Lead Free="Lead Free", Length=10.28mm, Manufacturer Part Number=MBR41H100CTG, Max Reverse Leakage Current=10uA, Max Reverse Voltage (DC)=100V, Max Surge Current=350A, Number of Pins=3, Packaging=Rail/Tube, Peak Non-Repetitive Surge Current=350A, Pricing 1="1=2.14000, 10=1.92400, 100=1.54640, 500=1.27050, 1000=1.05270, 2000=0.99000 (USD)", Radiation Hardening=No, REACH SVHC="No SVHC", RoHS=Yes, RoHS Compliant=Yes, Series=SWITCHMODE™, Stock 1=220, Supplier 1=Digi-Key, Voltage Rating (DC)=100V, Width=4.82mm
U21: "IC MCU 8BIT 28KB FLASH 44TQFP", Case/Package=TQFP, Frequency=32MHz, Manufacturer=Microchip, Manufacturer Part Number=PIC16F1779-I/PT, Max Operating Temperature=85°C, Max Supply Voltage=5.5V, Min Operating Temperature=-40°C, Min Supply Voltage=2.3V, Supplier Part Number 1=9125338P, Category=Microcontrollers, ComponentLink1Description=http://www.farnell.com/datasheets/2245186.pdf?src-supplier=Farnell, ComponentLink1URL=http://www.farnell.com/datasheets/2245186.pdf?src-supplier=Farnell, ComponentLink2Description=http://www.mouser.com/ds/2/268/40001819B-1066584.pdf?src-supplier=Mouser, ComponentLink2URL=http://www.mouser.com/ds/2/268/40001819B-1066584.pdf?src-supplier=Mouser, ComponentLink3Description=http://www.microchip.com/mymicrochip/filehandler.aspx?ddocname=en584356&src-supplier=Digi-Key, ComponentLink3URL=http://www.microchip.com/mymicrochip/filehandler.aspx?ddocname=en584356&src-supplier=Digi-Key, ComponentLink4Description=http://www.farnell.com/datasheets/1993941.pdf?src-supplier=Element14, ComponentLink4URL=http://www.farnell.com/datasheets/1993941.pdf?src-supplier=Element14, Core Architecture=PIC, Interface=I2C,SPI,UART,USART,LIN, Memory Size=28KB, Memory Type=FLASH, Number of I/Os=36, Number of Pins=44, Oscillator Type=Internal, Packaging=Tray, Peripherals="Brown-out Detect/Reset,POR,PWM,WDT", Pricing 1="10=3.22200, 24=3.14200, 100=3.06100 (USD)", RAM Size=2KB, REACH SVHC="No SVHC", RoHS=Yes, RoHS Compliant=Yes, Stock 1=232, Supplier 1=RSComponents
U23: "SWITCH KEYPAD 16 KEY NON-ILLUM", Manufacturer=Parallax, Max Current Rating=30mA, Package Quantity=1, Supplier Part Number 1=27899PAR-ND, Category="Screw and Nut Drivers", ComponentLink1Description=https://datasheet.ciiva.com/19453/2161473-19453254.pdf?src-supplier=Jameco, ComponentLink1URL=https://datasheet.ciiva.com/19453/2161473-19453254.pdf?src-supplier=Jameco, ComponentLink2Description=https://datasheet.ciiva.com/12466/27899-4x4matrixmembranekeypad-v1-2-33055-12466600.pdf?src-supplier=Mouser, ComponentLink2URL=https://datasheet.ciiva.com/12466/27899-4x4matrixmembranekeypad-v1-2-33055-12466600.pdf?src-supplier=Mouser, Illumination Type=Non-Illuminated, Manufacturer Part Number=27899, Mount=Panel,Front, Pricing 1="1=7.41000 (USD)", RoHS=Yes, Stock 1=50, Supplier 1=Digi-Key, Termination=Connector
U24: "TEXAS INSTRUMENTS         LM35DZ            Temperature Sensor IC, Voltage,  0.4C, +2 C, +100 C, TO-92, 3 Pins", Case/Package=TO-92, Manufacturer="TI National Semiconductor", Max Operating Temperature=100°C, Max Supply Voltage=30V, Min Operating Temperature=0°C, Min Supply Voltage=4V, Nominal Supply Current=91.5uA, Operating Supply Current=80uA, Output Current=10mA, Output Voltage=6V, Quiescent Current=56uA, Supplier Part Number 1=92F288, Category="Temperature and Humidity Sensors", ComponentLink1Description=https://datasheet.ciiva.com/27746/82-1000e-27746599.pdf?src-supplier=Rapid+Electronics, ComponentLink1URL=https://datasheet.ciiva.com/27746/82-1000e-27746599.pdf?src-supplier=Rapid+Electronics, ComponentLink2Description=https://datasheet.ciiva.com/1166/1896190-1166283.pdf?src-supplier=Element14, ComponentLink2URL=https://datasheet.ciiva.com/1166/1896190-1166283.pdf?src-supplier=Element14, Height=5.2mm, Interface=Serial,2-Wire, Lead Free="Contains Lead", Length=5.2mm, Manufacturer Part Number=LM35DZ, Max Supply Voltage (DC)=30V, Min Supply Voltage (DC)=4V, Mount="Through Hole", Number of Pins=3, Output Type=Analog, Packaging=Bulk, REACH SVHC="No SVHC", RoHS=No, RoHS Compliant=No, Series=LM35, Supplier 1=Newark, Supply Current=91.5uA, Width=4.19mm
U25: "I2C GPIO Expander 6V 16-Pin SOIC T/R", Case/Package=SOIC, Frequency=100kHz, Manufacturer="Texas Instruments", Max Operating Temperature=85°C, Max Supply Voltage=6V, Min Operating Temperature=-40°C, Min Supply Voltage=2.5V, Package Quantity=1, Supplier Part Number 1=296-13105-1-ND, Category="Interface ICs", ComponentLink1Description=https://datasheet.ciiva.com/1780/pcf8574a-1780193.pdf?src-supplier=Digi-Key, ComponentLink1URL=https://datasheet.ciiva.com/1780/pcf8574a-1780193.pdf?src-supplier=Digi-Key, ComponentLink2Description=https://datasheet.ciiva.com/1780/pcf8574a-1780194.pdf?src-supplier=Digi-Key, ComponentLink2URL=https://datasheet.ciiva.com/1780/pcf8574a-1780194.pdf?src-supplier=Digi-Key, ComponentLink3Description=https://datasheet.ciiva.com/1780/pcf8574a-1780195.pdf?src-supplier=Digi-Key, ComponentLink3URL=https://datasheet.ciiva.com/1780/pcf8574a-1780195.pdf?src-supplier=Digi-Key, ComponentLink4Description=https://datasheet.ciiva.com/3149/pcf8574a-3149367.pdf?src-supplier=Avnet, ComponentLink4URL=https://datasheet.ciiva.com/3149/pcf8574a-3149367.pdf?src-supplier=Avnet, ComponentLink5Description=https://datasheet.ciiva.com/46411/1768199-46411463.pdf?src-supplier=Element14, ComponentLink5URL=https://datasheet.ciiva.com/46411/1768199-46411463.pdf?src-supplier=Element14, ComponentLink6Description=https://datasheet.ciiva.com/3148/pcf8574a-3148520.pdf?src-supplier=Avnet, ComponentLink6URL=https://datasheet.ciiva.com/3148/pcf8574a-3148520.pdf?src-supplier=Avnet, Contact Plating=Gold, Lead Free="Lead Free", Manufacturer Part Number=PCF8574ADWR, Max Frequency=100kHz, Number of Bits=8, Number of I/Os=8, Number of Outputs=8, Number of Pins=16, Packaging="Tape and Reel", Pricing 1="1=1.72000, 10=1.54200, 25=1.46320, 100=1.20190, 250=1.12356, 500=0.99290, 1000=0.82331 (USD)", REACH SVHC="No SVHC", RoHS=Yes, RoHS Compliant=Yes, Series=-, Stock 1=5886, Supplier 1=Digi-Key, Termination=SMD/SMT, Weight=0.014829oz
Y1: "Crystal 22.1184MHz Ã‚Â±20ppm (Tol) Ã‚Â±30ppm (Stability) 18pF FUND 50Ohm 2-Pin Mini-CSMD T/R", Package=None, Availability=Unavailable, MF="{'manufacturer': u'Abracon LLC'}", MP=ABM7-16.000MHZ-D2Y-T, Price=None

## Free pads (board coordinates)
  round 6 hole 3: M1(5,166.1) M2(165,166.1) M3(165,5) M4(5,5)

## Via types
v1: diameter 0.6, hole 0.3, Top Layer to Bottom Layer(PWR), 141 vias

## Nets (pads, with @x,y where several pads share a name; then routed paths per layer and width w, separated by ;. In a path a pad name is that pad's centre, name@x,y a point inside that pad or via, vN(x,y) a via of type N, cw(c..) or ccw(c..) an arc to the next point about the centre after c; other vN are vias at no path point)
+5: 1.4 C1.1 C5.1 C9.1 C10.1 C11.1 C12.1 C17.1 C18.1 C25.1 C27.1 J8.01 J16.01 P4.1 P7.2 P8.7 Q10.3 R10.2 R11.2 R16.2 R21.1 R22.2 R24.2 R36.2 R62.2 R63.2 R64.2 U2.3 U3.7 U5.8 U6.2 U7.5 U8.2 U8.15 U9.4 U21.11 U21.32 U22.4 U24.1 U25.16 U26.3 U26.11 | length 820.4
  Top Layer w0.75: P7.2@6.451,109.96 9.96,109.96 10.65,110.65 ; v1(9.7,123.1) 12.9,126.3 12.9,130.2 12.35,130.75 R11.2@11.075,130.75 ; v1(10,112.8) 10,111.3 10.65,110.65 ; 11.05,56.25 11.05,54.35 v1(11.65,53.75) ; R36.2@13.575,112.25 12.189,112.25 11.75,111.811 11.75,111.75 10.65,110.65 ; U3.7@21.625,24.385 23.41,24.385 ; v1(22.9,27.9) 23,27.8 23,27.6 23.639,26.961 24.061,26.961 24.075,26.975 ; C11.1@25.675,27.5 24.6,27.5 24.075,26.975 ; v1(27.175,55.775) 27.75,56.35 27.75,58.45 ; U7.5@30.475,57 29.2,57 27.75,58.45 ; v1(32.2,92.1) 35.361,92.1 35.8,92.539 35.8,93.714 C18.1@36.066,93.98 36.066,99.816 ; C17.1@38.191,100.584 38.191,100.675 38.116,100.75 37,100.75 36.066,99.816 ; U21.11@44.196,112.268 44.196,108.696 39.25,103.75 38,103.75 36.066,101.816 36.066,99.816 ; C10.1@45.45,59.75 41.25,59.75 39.75,61.25 28.25,61.25 27.75,60.75 27.75,58.45 ; U2.3@60.07,165 68.3,165 73.5,159.8 73.5,155.289 ; U22.4@63.88,3.5 63.88,1.689 63.441,1.25 56.95,1.25 53.075,5.125 26.625,5.125 R10.2@19.29,12.46 19.29,15.69 23.7,20.1 23.7,24.095 23.41,24.385 ; C5.1@70.48,154.175 70.475,154.18 70.475,154.85 70.914,155.289 73.5,155.289 ; v1(76.4,102.4) 76.5,102.5 86.644,102.5 87.972,101.172 87.972,98.278 92.194,102.5 99,102.5 102.25,99.25 102.25,91.5 96.6,85.85 96.6,55.35 ; C1.1@78.3,155.25 78.261,155.289 73.5,155.289 ; U26.3@78.506,108.56 78.506,106.506 78,106 73.25,106 71.561,107.689 71.561,112.311 77.216,117.966 U26.11@77.216,134.112 77.216,136.061 77.655,136.5 82.8,136.5 ; v1(83.6,155.4) 83.6,153.2 84.4,152.4 85.241,152.4 ; R24.2@86.6,155.125 86.6,153.043 86.521,152.964 86.521,152.839 86.082,152.4 85.241,152.4 ; U5.8@92.375,51.905 94.311,51.905 94.75,52.344 94.75,53.5 96.6,55.35 ; P8.7@94.25,128.49 94.25,132.5 90.25,136.5 82.8,136.5 ; R62.2@97,158.825 96.975,158.825 96.9,158.9 96.9,161.161 97.339,161.6 101.8,161.6 ; C27.1@99,53.175 98.75,53.425 98.75,55.061 98.311,55.5 96.75,55.5 96.6,55.35 ; R63.2@101.8,158.825 101.8,161.6 ; R64.2@107.1,158.825 107.1,160.2 105.7,161.6 101.8,161.6 ; U25.16@109.9,152.57 113.47,152.57 v1(113.6,152.7) ; v1(110,162.8) 102.439,162.8 102,162.361 102,161.8 101.8,161.6 ; R21.1@121.725,150.1 121.725,150.625 121.7,150.65 121.239,150.65 120.8,151.089 120.8,155.2 123.315,157.715 125.485,157.715 ; U8.2@126.313,164.995 126.313,159.558 125.485,158.73 125.485,157.715 ; R22.2@129.125,155.6 127.6,155.6 125.485,157.715 ; 23.41,24.385 24.075,25.05 24.075,26.975 ; 82.8,136.5 82.8,144.35 82.725,144.425 82.725,146.025 85,148.3 85,152.159 85.241,152.4